# Altium PCB ECU_Carrier_PCB.PcbDoc
Units mm, origin at the board's own origin, x right, y up, seen from the top; angles counter-clockwise.
Board outline 100 x 80 mm, 2 copper layers (Top Layer, Bottom Layer); 73 components, 55 nets, 222 pads, 37 vias.
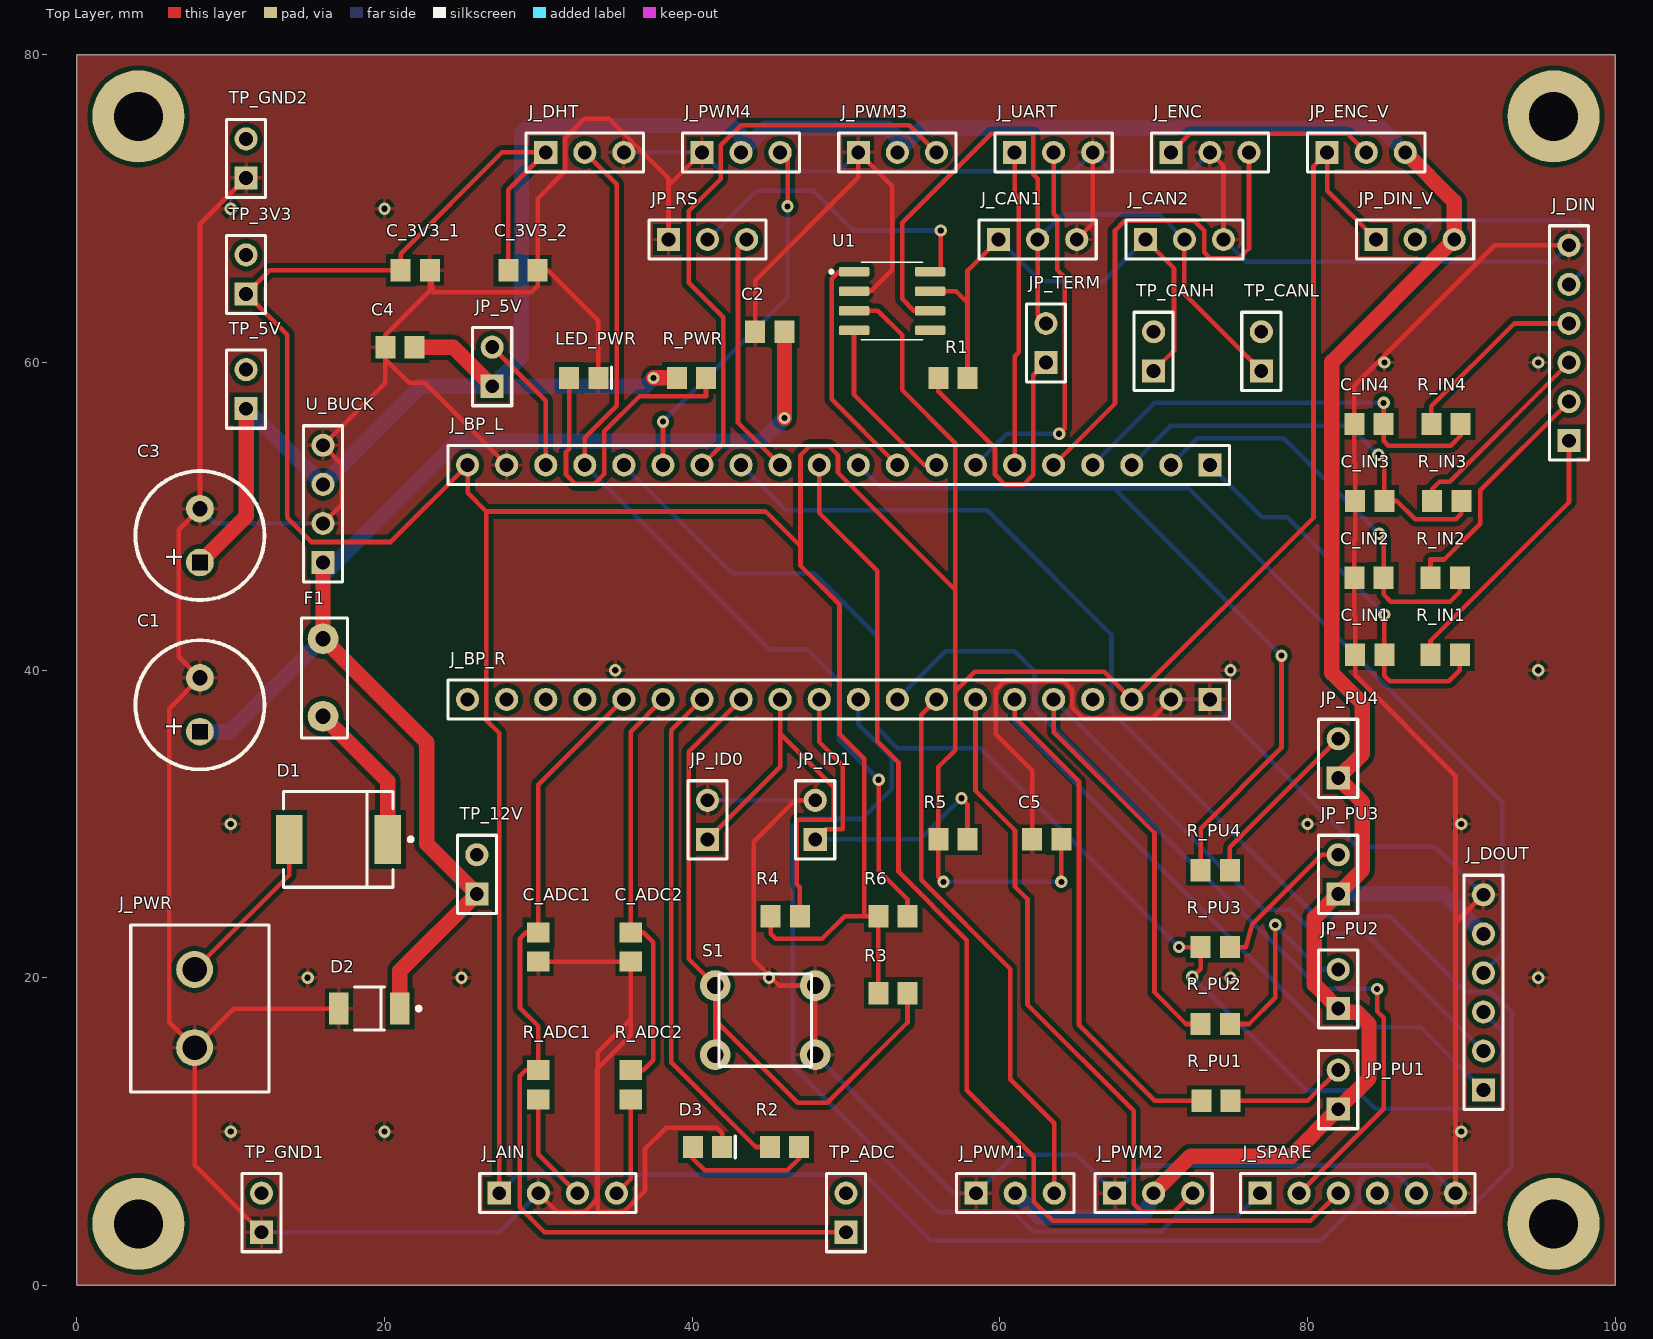
[diagram p0: Top Layer view]
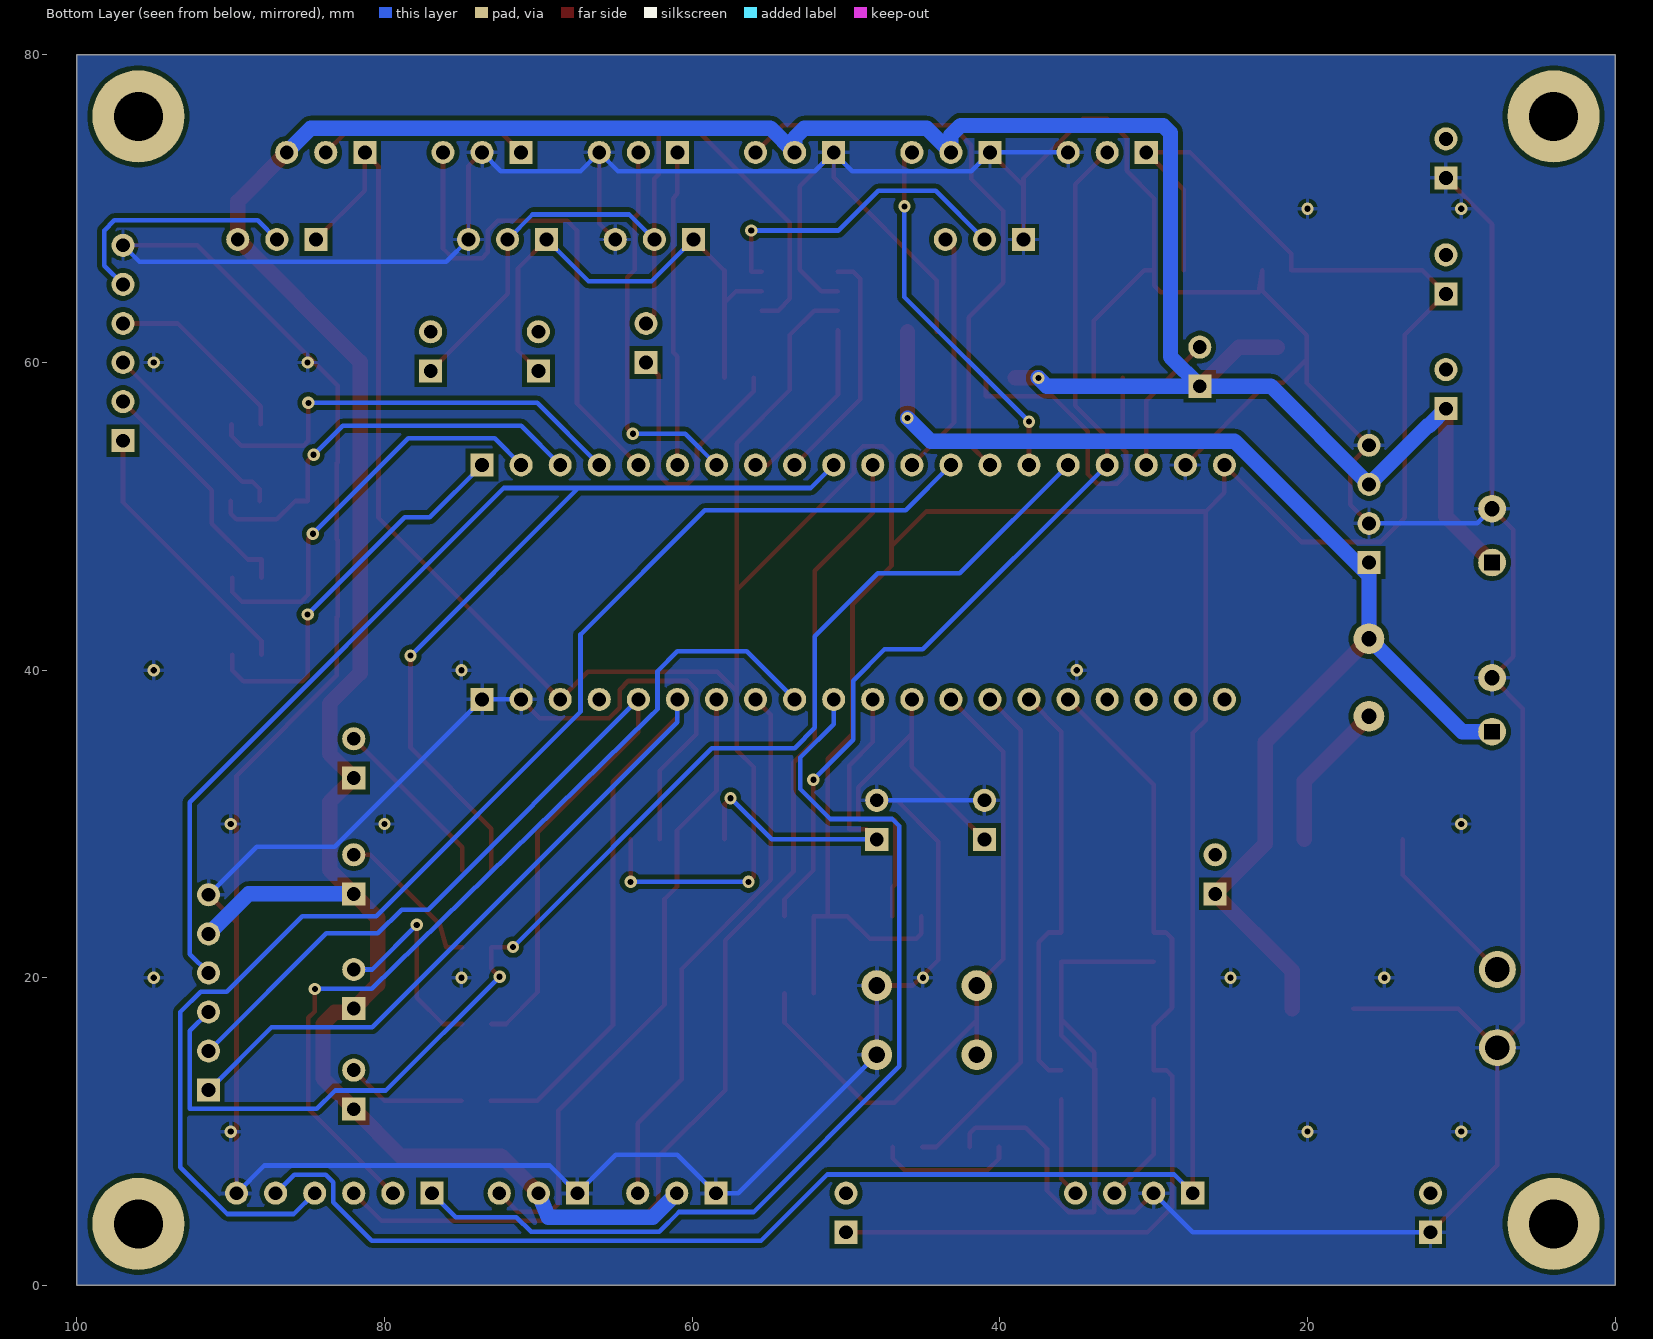
[diagram p1: Bottom Layer view, seen from below]

## Layer stack, top to bottom
Top Solder: solder mask 0.0102, Solder Resist, Dk 3.5
Top Layer: signal copper 0.0356
Dielectric 1: dielectric 0.32, FR-4, Dk 4.8
Bottom Layer: signal copper 0.0356
Bottom Solder: solder mask 0.0102, Solder Resist, Dk 3.5

## Board outline
0,0 0,80 100,80 100,0

## Design rules (kind name [scope] priority, off if disabled: settings)
Clearance [All] p1: gap=0.3 ignorepadtopadclearanceinfootprint=FALSE
HoleSize [All] p1: absolutevalues=TRUE maxlimit=3.5 minlimit=0.025 maxpercent=80.000 minpercent=20.000
MinimumAnnularRing [All] p1: minimumring=0.15
MinimumSolderMaskSliver [All] p1: minsoldermaskwidth=0.05
PolygonConnect [All] p1: connectstyle=Relief reliefconductorwidth=0.254 reliefentries=4 polygonreliefangle="90 Angle" airgapwidth=0.254
RoutingVias [All] p1: holewidth=0.4 width=0.8 viastyle="Through Hole" minholewidth=0.4 minwidth=0.8 maxholewidth=0.5 maxwidth=1
SilkToSolderMaskClearance [IsPad] p1: minsilkscreentomaskgap=0 clearancetoexposedcopper=TRUE
SolderMaskExpansion [All] p1: expansion=0.102 istentingtop=FALSE useseparateexpansions=TRUE expansionbottom=0.102 istentingbottom=FALSE
Width Width_Power [InNet('NET_J_PWR') Or InNet('12V_IN') Or InNet('12V_PROT') Or InNet('5V')] p1: maxlimit=1.5 minlimit=0.4 preferedwidth=1 minimp=50.000000 maximp=50.000000 favimp=50.000000
Width Width_Default [All] p2: maxlimit=1.5 minlimit=0.254 preferedwidth=0.3 minimp=50.000000 maximp=50.000000 favimp=50.000000
27 further rules are at their usual default settings.

## Components (designator, comment, footprint, x,y, rotation, side; value= is the part's Value field where it differs from the comment)
C1 "100uF" CP_D8_P3.5 8,36 r90 top
C2 "100nF" C_0805 45.05,62 r0 top
C3 "470uF" CP_D8_P3.5 8,47 r90 top
C4 "100nF" C_0805 21,61 r0 top
C5 "100nF" C_0805 63.05,29 r0 top
C_3V3_1 "10uF" C_0805 22,66 r0 top
C_3V3_2 "100nF" C_0805 29,66 r0 top
C_ADC1 "100nF" C_0805 30,22 r90 top
C_ADC2 "100nF" C_0805 36,22 r90 top
C_IN1 "100nF" C_0805 84.05,41 r0 top
C_IN2 "100nF" C_0805 84,46 r0 top
C_IN3 "100nF" C_0805 84.05,51 r0 top
C_IN4 "100nF" C_0805 84,56 r0 top
D1 "SS34-E3/57T" FP-95402-MFG 17,29 r180 top
D2 "SMAJ15A" FP-SMA-MFG 19.015,18 r180 top
D3 "LED1" LED_0805 41,9 r0 top
F1 "2A Polyfuse" FUSE_P5.08 16,37 r90 top
J_AIN "ANALOG IN" HDR1X4 27.46,6 r0 top
J_BP_L "J_BP_L" HDR1X20 73.66,53.34 r180 top
J_BP_R "J_BP_R" HDR1X20 73.66,38.1 r180 top
J_CAN1 "Header 3" HDR1X3 59.92,68 r0 top
J_CAN2 "Header 3" HDR1X3 69.46,68 r0 top
J_DHT "DHT22" HDR1X3 30.48,73.66 r0 top
J_DIN "DIGITAL INPUTS" HDR1X6 97,54.92 r90 top
J_DOUT "DIGITAL OUTPUTS" HDR1X6 91.44,12.7 r90 top
J_ENC "ENCODER" HDR1X3 71.12,73.66 r0 top
J_PWM1 "Header 3" HDR1X3 58.46,6 r0 top
J_PWM2 "Header 3" HDR1X3 67.46,6 r0 top
J_PWM3 "Header 3" HDR1X3 50.8,73.66 r0 top
J_PWM4 "Header 3" HDR1X3 40.64,73.66 r0 top
J_PWR "691701500002B" 691701500002B 8,18 r270 top
J_SPARE "SPARE EXP" HDR1X6 76.92,6 r0 top
J_UART "UART LOG" HDR1X3 60.96,73.66 r0 top
JP_5V "Header 2" HDR1X2 27,58.46 r90 top
JP_DIN_V "DIN_VCC SEL" HDR1X3 84.46,68 r0 top
JP_ENC_V "ENC_VCC SEL" HDR1X3 81.28,73.66 r0 top
JP_ID0 "JP_ID0" HDR1X2 41,29 r90 top
JP_ID1 "JP_ID1" HDR1X2 48,29 r90 top
JP_PU1 "PULL-UP EN" HDR1X2 82,11.46 r90 top
JP_PU2 "PULL-UP EN" HDR1X2 82,18 r90 top
JP_PU3 "PULL-UP EN" HDR1X2 82,25.46 r90 top
JP_PU4 "PULL-UP EN" HDR1X2 82,33 r90 top
JP_RS "JP_RS" HDR1X3 38.46,68 r0 top
JP_TERM "JP_TERM" HDR1X2 63,60 r90 top
LED_PWR "LED GREEN" LED_0805 32.95,59 r0 top
R1 "120R" R_0805 56.95,59 r0 top
R2 "330" R_0805 46,9 r0 top
R3 "10KR" R_0805 53.05,19 r0 top
R4 "10KR" R_0805 46.05,24 r0 top
R5 "10KR" R_0805 56.95,29 r0 top
R6 "10KR" R_0805 53.05,24 r0 top
R_ADC1 "1k" R_0805 30,13.05 r90 top
R_ADC2 "1K" R_0805 36,13.05 r90 top
R_IN1 "1K" R_0805 88.95,41 r0 top
R_IN2 "1K" R_0805 88.95,46 r0 top
R_IN3 "1K" R_0805 89.05,51 r0 top
R_IN4 "1K" R_0805 89,56 r0 top
R_PU1 "4K7" R_0805 74.05,12 r0 top
R_PU2 "4K7" R_0805 74,17 r0 top
R_PU3 "4K7" R_0805 74,22 r0 top
R_PU4 "4K7" R_0805 74,27 r0 top
R_PWR "1K" R_0805 39.95,59 r0 top
S1 "SW-PB" SW_TACT_6x6 44.75,17.25 r0 top
TP_3V3 "Header 2" HDR1X2 11,64.46 r90 top
TP_5V "Header 2" HDR1X2 11,57 r90 top
TP_12V "Header 2" HDR1X2 26,25.46 r90 top
TP_ADC "Header 2" HDR1X2 50,3.46 r90 top
TP_CANH "Header 2" HDR1X2 70,59.46 r90 top
TP_CANL "Header 2" HDR1X2 77,59.46 r90 top
TP_GND1 "Header 2" HDR1X2 12,3.46 r90 top
TP_GND2 "Header 2" HDR1X2 11,72 r90 top
U1 "SN65HVD230" SOIC127P599X175-8N 53,64 r0 top
U_BUCK "U_BUCK" HDR1X4 16,47 r90 top

## Footprints (in the part's own frame and the unit in brackets; to place one, negate y for a bottom-side part, rotate by r counter-clockwise, add the part's x,y. Pads: shape width x height; smd on the part's side, far side on the other; paste and mask are expansions set on the pad)
691701500002B [mm] "THR - 5,08mm - PCB Vertical Open - 02p"
  round 2.4 hole 1.6: 1(-2.54,-0.35) 2(2.54,-0.35)
  silkscreen extent -5.43,-4.5 5.43,4.5, body extent -5.08,-4.25 5.08,4.25, height 12.05
C_0805 [mm] "Chip Capacitor, 2-Leads, Body 2.00x1.25mm, IPC Low Density"
  rect 1.3x1.45 smd: 1(-0.95,0) 2(0.95,0)
  body extent -1.05,-0.67 1.05,0.67, height 0.6
CP_D8_P3.5 [mm]
  round 1.8 hole 1 square: 1(0,0)
  round 1.8 hole 1: 2(3.5,0)
  silkscreen extent -2.44,-4.2 5.94,4.2
FP-95402-MFG [mm]
  rect 1.72x3.2 smd paste+0 mask+0: 1(-3.205,0) 2(3.205,0)
  silkscreen extent -4.83,-3.11 3.56,3.11, body extent -4.17,-3.21 4.17,3.21, height 0.25
FP-SMA-MFG [mm]
  rect 1.27x2.1 smd paste+0 mask+0: 1(-1.985,0) 2(1.985,0)
  silkscreen extent -3.32,-1.39 0.98,1.4, body extent -2.72,-1.5 2.72,1.5, height 0.25
FUSE_P5.08 [mm]
  round 2 hole 1: 1(0,0) 2(5.05,0)
  silkscreen extent -1.4,-1.6 6.4,1.4
HDR1X2 [mm] "Connector; Header; 2 Position"
  rect 1.5x1.5 hole 0.9: 1(0,0)
  round 1.5 hole 0.9: 2(2.54,0)
  silkscreen extent -1.27,-1.27 3.81,1.27
HDR1X3 [mm] "Connector; Header; 3 Position"
  rect 1.5x1.5 hole 0.9: 1(0,0)
  round 1.5 hole 0.9: 2(2.54,0) 3(5.08,0)
  silkscreen extent -1.27,-1.27 6.35,1.27
HDR1X4 [mm] "Connector; Header; 4 Position"
  rect 1.5x1.5 hole 0.9: 1(0,0)
  round 1.5 hole 0.9: 2(2.54,0) 3(5.08,0) 4(7.62,0)
  silkscreen extent -1.27,-1.27 8.89,1.27
HDR1X6 [mm] "Connector; Header; 6 Position"
  rect 1.5x1.5 hole 0.9: 1(0,0)
  round 1.5 hole 0.9: 2(2.54,0) 3(5.08,0) 4(7.62,0) 5(10.16,0) 6(12.7,0)
  silkscreen extent -1.27,-1.27 13.97,1.27
HDR1X20 [mm] "Connector; Header; 20 Position"
  rect 1.5x1.5 hole 0.9: 1(0,0)
  round 1.5 hole 0.9: 2(2.54,0) 3(5.08,0) 4(7.62,0) 5(10.16,0) 6(12.7,0) 7(15.24,0) 8(17.78,0) 9(20.32,0) 10(22.86,0) 11(25.4,0) 12(27.94,0) 13(30.48,0) 14(33.02,0) 15(35.56,0) 16(38.1,0) 17(40.64,0) 18(43.18,0) 19(45.72,0) 20(48.26,0)
  silkscreen extent -1.27,-1.27 49.53,1.27
LED_0805 [mm] "Chip Led, 2-Leads, Body 2.00x1.25mm, IPC Low Density"
  rect 1.3x1.45 smd: 1(-0.95,0) 2(0.95,0)
  silkscreen extent 1.8,-0.7 1.8,0.7, body extent -1.05,-0.67 1.05,0.67, height 0.6
R_0805 [mm] "Chip Resistor, 2-Leads, Body 2.00x1.25mm, IPC Low Density"
  rect 1.3x1.45 smd: 1(-0.95,0) 2(0.95,0)
  body extent -1.05,-0.67 1.05,0.67, height 0.6
SOIC127P599X175-8N [mm]
  rrect25% 1.97x0.6 smd: 1(-2.47,1.905) 2(-2.47,0.635) 3(-2.47,-0.635) 4(-2.47,-1.905) 5(2.47,-1.905) 6(2.47,-0.635) 7(2.47,0.635) 8(2.47,1.905)
  silkscreen extent -4.05,-2.52 1.99,2.52, body extent -3,-2.45 3,2.45, height 1.75
SW_TACT_6x6 [mm]
  round 2 hole 1.1: 1(-3.25,-2.25) 1(-3.25,2.25) 2(3.25,-2.25) 2(3.25,2.25)
  silkscreen extent -3,-3 3,3

## Part data
C1 C3: library part "Cap Pol1", "Polarized Capacitor (Radial)", LatestRevisionDate=17-Jul-2002, LatestRevisionNote="Re-released for DXP Platform.", PackageDescription="Polarized Capacitor (Radial); 2 Leads", PackageReference=RB7.6-15, Published=8-Jun-2000, Publisher="Altium Limited"
C2 C4 C5 C_3V3_1 C_3V3_2 C_ADC1 C_ADC2 C_IN1 C_IN2 C_IN3: library part Cap, "Capacitor", LatestRevisionDate=17-Jul-2002, LatestRevisionNote="Re-released for DXP Platform.", PackageDescription="Radial Cap, Thru-Hole; 2 Leads; 0.3 in Pin Spacing", PackageReference=RAD-0.3, Published=8-Jun-2000, Publisher="Altium Limited"
C_IN4: library part Cap, LatestRevisionDate=17-Jul-2002, LatestRevisionNote="Re-released for DXP Platform.", PackageDescription="Radial Cap, Thru-Hole; 2 Leads; 0.3 in Pin Spacing", PackageReference=RAD-0.3, Published=8-Jun-2000, Publisher="Altium Limited"
D1: library part CMP-02539-000012-1, "DIODE SCHOTTKY 40V 3A DO214AB", Forward Current=3A, Manufacturer=Vishay, Max Junction Temp=+150°C, Max Repetitive Reverse Voltage=40V, Max Surge Forward Current=100A, Package=95402, Peak Reverse Current=0.5mA, Temperature="-55°C to +150°C", Temperature Range Low=-55°C, Automotive=No, Category=Diode, ComponentLink2Description=Datasheet, ComponentLink2URL=http://www.vishay.com/docs/88751/ss32.pdf, Device Class L1="Discrete Semiconductors", Device Class L2=Diodes, Device Class L3="Schottky Diodes", Digikey Description="DIODE SCHOTTKY 40V 3A DO214AB", Footprint Url=http://www.vishay.com/docs/95402/smc.pdf, Height=2.62mm, Lead Free=Yes, Manufacturer Part Number=SS34-E3/57T, Mouser Description="Schottky Diodes & Rectifiers 3.0 Amp 40 Volt", Octopart=https://octopart.com/ss34-e3%2F57t-vishay-39552907, RoHS=TRUE, Standoff Height=0mm, Temperature Range High=+150°C
D2: library part CMP-07401-000026-1, "TVS DIODE 15V 24.4V SMA", Breakdown Voltage=16.7V, Clamping Voltage=24.4V, Manufacturer="Bourns Inc.", Max Junction Temp=+150°C, Package=SMA, Peak Pulse Current=16.4A, Peak Pulse Power=400W, Reverse Standoff Voltage=15V, Temperature="-55°C to +150°C", Temperature Range Low=-55°C, Automotive=No, Category=Diode, ComponentLink2Description=Datasheet, ComponentLink2URL=https://www.bourns.com/docs/Product-Datasheets/SMAJ.pdf, Device Class L1="Circuit Protection", Device Class L2="TVS Diodes", Device Class L3=unset, Digikey Description="TVS DIODE 15V 24.4V SMA", Direction=Unidirectional, Height=2.29mm, Lead Free=Yes, Manufacturer Part Number=SMAJ15A, Mouser Description="Bourns Smaj15a / Diode Tvs 15v 400w Uni 5% Smd Bourns", Number Of Channels=1, Octopart=https://octopart.com/smaj15a-bourns-12809353, RoHS=TRUE, Temperature Range High=+150°C
D3: "Typical RED GaAs LED", LatestRevisionDate=08-Jul-2005, LatestRevisionNote="Mech Layer 1 removed.", PackageDescription="LED; 2 Leads", PackageReference=LED-1, Published=8-Jun-2000, Publisher="Altium Limited"
F1: library part "Fuse 1", "Fuse", LatestRevisionDate=17-Jul-2002, LatestRevisionNote="Re-released for DXP Platform.", PackageDescription="Thru-Hole; 2 Leads", PackageReference=PIN-W2/E2.8, Published=8-Jun-2000, Publisher="Altium Limited"
J_AIN U_BUCK: library part "Header 4", "Header, 4-Pin", LatestRevisionDate=17-Jul-2002, LatestRevisionNote="Re-released for DXP Platform.", Publisher="Altium Limited"
J_BP_L J_BP_R: library part "Header 20", "Header, 20-Pin", LatestRevisionDate=17-Jul-2002, LatestRevisionNote="Re-released for DXP Platform.", Publisher="Altium Limited"
J_CAN1 J_CAN2 J_PWM1 J_PWM2 J_PWM3 J_PWM4: "Header, 3-Pin", LatestRevisionDate=17-Jul-2002, LatestRevisionNote="Re-released for DXP Platform.", Publisher="Altium Limited"
J_DHT J_ENC J_UART JP_DIN_V JP_ENC_V JP_RS: library part "Header 3", "Header, 3-Pin", LatestRevisionDate=17-Jul-2002, LatestRevisionNote="Re-released for DXP Platform.", Publisher="Altium Limited"
J_DIN J_DOUT J_SPARE: library part "Header 6", "Header, 6-Pin", LatestRevisionDate=17-Jul-2002, LatestRevisionNote="Re-released for DXP Platform.", Publisher="Altium Limited"
J_PWR: library part CMP-1502-02318-3, "Terminal Block, 5.08MM, Open Vertical Pcb Header, Thr Type, 2 Pins", Color=Black, Current Rating=10A, Max Operating Temperature=105°C, Min Operating Temperature=-40°C, Voltage Rating=300V, Connector Type="Terminal Block", Contact Gender=Male, Contact Material=Brass, Contact Plating=Tin, Gender=Male, Housing Material=Polymer, Lead Pitch=5.08mm, Length=9.76mm, Mount="Through Hole", Number of Contacts=2, Number of Pins=2, Pitch=5.08mm, REACH SVHC=Unknown, RoHS=Compliant, Termination=PCB
JP_5V TP_3V3 TP_5V TP_12V TP_ADC TP_CANH TP_CANL TP_GND1 TP_GND2: "Header, 2-Pin", LatestRevisionDate=17-Jul-2002, LatestRevisionNote="Re-released for DXP Platform.", Publisher="Altium Limited"
JP_ID0 JP_ID1 JP_PU1 JP_PU2 JP_PU3 JP_PU4 JP_TERM: library part "Header 2", "Header, 2-Pin", LatestRevisionDate=17-Jul-2002, LatestRevisionNote="Re-released for DXP Platform.", Publisher="Altium Limited"
LED_PWR: library part LED2, "Typical RED, GREEN, YELLOW, AMBER GaAs LED", LatestRevisionDate=17-Jul-2002, LatestRevisionNote="Re-released for DXP Platform.", PackageDescription="SM LED; 2 Flat Leads", PackageReference=3.2X1.6X1.1, PackageVersion=Feb-2002, Published=8-Jun-2000, Publisher="Altium Limited"
R1 R2 R3 R4 R5 R6 R_ADC1 R_ADC2 R_IN1 R_IN2 R_IN3 R_IN4 R_PU1 R_PU2 R_PU3 R_PU4 R_PWR: library part Res1, "Resistor", LatestRevisionDate=17-Jul-2002, LatestRevisionNote="Re-released for DXP Platform.", PackageDescription="Axial Device, Thru-Hole; 2 Leads; 0.3 in Pin Spacing", PackageReference=AXIAL-0.3, Published=8-Jun-2000, Publisher="Altium Limited"
S1: "Switch", LatestRevisionDate=17-Jul-2002, LatestRevisionNote="Re-released for DXP Platform.", PackageDescription="Switch; 2 Leads", PackageReference=SPST-2, Published=24-Mar-1999, Publisher="Altium Limited"
U1: "1/1 Transceiver Half CANbus 8-SOIC", Package="SOIC-8 Texas Instruments", Check_prices=https://www.snapeda.com/parts/SN65HVD230/Texas+Instruments/view-part/?ref=eda, MF="Texas Instruments", MP=SN65HVD230, SnapEDA_Link=https://www.snapeda.com/parts/SN65HVD230/Texas+Instruments/view-part/?ref=snap

## Free pads (board coordinates)
  round 6 hole 3.2 unplated: MH1(4,4) MH2(96,4) MH3(96,76) MH4(4,76)

## Via types
v1: diameter 0.8, hole 0.4, Top Layer to Bottom Layer, tented both sides, 37 vias

## Nets (pads, with @x,y where several pads share a name; then routed paths per layer and width w, separated by ;. In a path a pad name is that pad's centre, name@x,y a point inside that pad or via, vN(x,y) a via of type N, cw(c..) or ccw(c..) an arc to the next point about the centre after c; other vN are vias at no path point)
3V3: C5.2 C_3V3_1.1 C_3V3_2.1 J_AIN.1 J_BP_L.20 J_BP_R.3 J_DHT.1 J_SPARE.5 JP_DIN_V.1 JP_ENC_V.1 R3.1 R4.1 R5.1 R6.1 TP_3V3.1 U1.3 | length 369.9
  Top Layer w0.3: J_AIN.1 27.46,35.913 26.619,36.754 26.619,50.317 ; C_3V3_2.1 28.05,71.23 J_DHT.1 27.635,73.66 21.05,67.075 C_3V3_1.1 12.54,66 TP_3V3.1 13.665,61.795 13.665,49.911 15.24,48.336 20.396,48.336 J_BP_L.20 25.4,51.537 26.619,50.317 ; R4.1 45.1,22.86 45.43,22.53 48.441,22.53 49.911,24 51.184,24 ; U1.3 52.07,63.365 53.645,61.79 53.645,58.217 57.099,54.762 57.099,45.212 ; R3.1 R6.1 51.184,24 ; v1(56.337,26.238) 56,26.575 R5.1 56,33.706 57.099,34.805 57.099,38.633 ; v1(64,26.238) C5.2 ; JP_DIN_V.1 81.28,71.18 JP_ENC_V.1 80.391,72.771 80.391,49.911 J_BP_R.3 66.78,39.9 58.366,39.9 57.099,38.633 ; 26.619,50.317 44.78,50.317 47.041,48.057 ; 47.041,48.057 47.041,53.975 47.625,54.559 48.895,54.559 49.479,53.975 49.479,52.832 57.099,45.212 ; 47.041,48.057 47.041,46.787 49.581,44.247 49.581,35.839 51.184,34.236 51.184,24 ; 57.099,38.633 57.099,45.212
  Bottom Layer w0.3: J_AIN.1 28.674,7.214 51.206,7.214 55.525,2.895 80.822,2.895 83.337,5.41 83.337,6.717 83.82,7.2 85.88,7.2 J_SPARE.5 ; v1(56.337,26.238) v1(64,26.238)
5V: C3.1 C4.2 J_DOUT.5 J_PWM1.2 J_PWM2.2 J_PWM3.2 J_PWM4.2 JP_5V.1 JP_DIN_V.3 JP_ENC_V.3 JP_PU1.1 JP_PU2.1 JP_PU3.1 JP_PU4.1 R_PWR.1 TP_5V.1 U_BUCK.3 | length 238.3
  Top Layer w1: C3.1 11,50 TP_5V.1 ; C4.2 24.46,61 JP_5V.1 ; v1(37.49,59) R_PWR.1 ; J_PWM2.2 72.407,8.407 78.947,8.407 JP_PU1.1 84,13.46 84,17 83.25,17.75 82.25,17.75 80.442,19.558 80.442,23.902 JP_PU3.1 83.566,27.026 83.566,31.434 JP_PU4.1 83.566,34.566 83.566,37.821 81.585,39.802 81.585,60.045 JP_DIN_V.3 89.54,70.48 JP_ENC_V.3
  Bottom Layer w1: TP_5V.1 12.116,55.884 12.196,55.884 U_BUCK.3 22.38,58.46 JP_5V.1 ; v1(37.49,59) 36.95,58.46 JP_5V.1 ; J_PWM1.2 62.555,4.445 69.365,4.445 J_PWM2.2 ; JP_PU3.1 88.84,25.46 J_DOUT.5 ; JP_ENC_V.3 84.785,75.235 54.915,75.235 J_PWM3.2 53.34,74.6 52.705,75.235 44.755,75.235 J_PWM4.2 43.18,74.778 42.545,75.413 29.388,75.413 28.905,74.93 28.905,60.365 JP_5V.1
5V_BP: J_BP_L.18 JP_5V.2 | length 9.1
  Top Layer w0.3: JP_5V.2 30.48,57.52 J_BP_L.18
12V_IN: D1.1 F1.1 | length 9.7
  Top Layer w1: F1.1 20.205,32.795 D1.1
12V_PROT: C1.1 C2.2 D2.1 F1.2 TP_12V.1 U_BUCK.1 | length 89.7
  Top Layer w1: U_BUCK.1 F1.2 22.733,35.317 22.733,28.727 TP_12V.1 21,20.46 D2.1 ; v1(46,56.389) C2.2
  Bottom Layer w1: C1.1 9.95,36 F1.2 16,46.15 24.74,54.89 44.501,54.89 v1(46,56.389)
ADC_A: C_ADC1.2 J_BP_R.16 R_ADC1.2 TP_ADC.1 | length 59.7
  Top Layer w0.3: J_BP_R.16 30,32.54 C_ADC1.2 29.21,22.95 28.804,22.544 28.804,18.062 30,16.866 R_ADC1.2 29.164,14 28.778,13.614 28.778,5.08 30.398,3.46 TP_ADC.1
ADC_B: C_ADC2.2 J_BP_R.15 R_ADC2.2 | length 27.2
  Top Layer w0.3: R_ADC2.2 36.83,14 37.465,14.635 37.465,22.315 36.83,22.95 C_ADC2.2 36,36 J_BP_R.15
CAN_H: J_CAN1.1 J_CAN2.1 R1.2 TP_CANH.1 U1.7 | length 34.2
  Top Layer w0.3: U1.7 57.15,64.635 57.9,63.885 ; R1.2 57.9,63.885 ; J_CAN1.1 57.9,65.98 57.9,63.885 ; J_CAN2.1 71.323,66.137 71.323,60.783 TP_CANH.1
  Bottom Layer w0.3: J_CAN1.1 62.642,65.278 66.738,65.278 J_CAN2.1
CAN_L: J_CAN1.2 J_CAN2.2 JP_TERM.2 TP_CANL.1 U1.6 | length 52.2
  Top Layer w0.3: U1.6 54.415,63.365 53.645,64.135 53.645,69.088 59.436,74.879 62.179,74.879 62.179,72.238 62.46,71.957 J_CAN1.2 62.46,63.08 JP_TERM.2 ; J_CAN2.2 72,64.46 TP_CANL.1
  Bottom Layer w0.3: J_CAN1.2 64.081,69.621 70.379,69.621 J_CAN2.2
CAN_RX: J_BP_L.8 U1.4 | length 11.4
  Top Layer w0.3: U1.4 50.521,62.095 50.521,57.912 55.093,53.34 J_BP_L.8
CAN_STBY: J_BP_L.12 JP_RS.3 | length 16
  Top Layer w0.3: JP_RS.3 42.977,67.437 42.977,56.083 J_BP_L.12
CAN_TX: J_BP_L.9 U1.1 | length 15.5
  Top Layer w0.3: U1.1 49.53,65.905 49.073,65.448 49.073,57.607 J_BP_L.9
DHT_DATA: J_BP_L.17 J_DHT.2 R6.2 | length 61.5
  Top Layer w0.3: J_BP_L.17 33.02,55.118 35.103,57.201 35.103,71.577 J_DHT.2 ; v1(52.121,32.874) 52.121,26.975 54,25.096 R6.2
  Bottom Layer w0.3: J_BP_L.17 45.009,41.351 47.498,41.351 49.53,39.319 49.53,35.465 v1(52.121,32.874)
DI_1: C_IN1.2 J_BP_L.1 R_IN1.2 | length 25.7
  Top Layer w0.3: v1(85,43.626) C_IN1.2 85,39.638 85.36,39.278 89.173,39.278 89.9,40.005 R_IN1.2
  Bottom Layer w0.3: J_BP_L.1 77.064,49.936 78.689,49.936 v1(85,43.626)
DI_2: C_IN2.2 J_BP_L.2 R_IN2.2 | length 27.2
  Top Layer w0.3: v1(84.658,48.87) 84.95,48.578 C_IN2.2 84.95,44.92 85.42,44.45 89.265,44.45 89.9,45.085 R_IN2.2
  Bottom Layer w0.3: J_BP_L.2 72.847,55.067 78.461,55.067 v1(84.658,48.87)
DI_3: C_IN3.2 J_BP_L.3 R_IN3.2 | length 27.5
  Top Layer w0.3: v1(84.607,54) 85,53.608 C_IN3.2 85.804,51 86.995,49.809 89.644,49.809 90,50.165 R_IN3.2
  Bottom Layer w0.3: J_BP_L.3 71.12,55.88 82.728,55.88 v1(84.607,54)
DI_4: C_IN4.2 J_BP_L.4 R_IN4.2 | length 29.2
  Top Layer w0.3: v1(84.95,57.379) C_IN4.2 84.95,54.902 85.252,54.6 89.305,54.6 89.95,55.245 R_IN4.2
  Bottom Layer w0.3: J_BP_L.4 70.079,57.379 v1(84.95,57.379)
DIN_VCC: J_DIN.5 JP_DIN_V.2 | length 16
  Bottom Layer w0.3: JP_DIN_V.2 88.24,69.24 97.561,69.24 98.222,68.58 98.222,66.302 J_DIN.5
DO_1: J_BP_R.6 J_DOUT.1 R_PU1.1 | length 74.8
  Top Layer w0.3: J_BP_R.6 60.96,36.932 65.151,32.741 65.151,16.928 70.079,12 R_PU1.1
  Bottom Layer w0.3: J_BP_R.6 60.96,36.627 80.797,16.789 87.351,16.789 J_DOUT.1
DO_2: J_BP_R.5 J_DOUT.2 R_PU2.1 | length 63
  Top Layer w0.3: J_BP_R.5 63.5,35.966 70.053,29.413 70.053,19.05 72.103,17 R_PU2.1
  Bottom Layer w0.3: J_BP_R.5 77.167,24.433 78.891,24.433 80.439,22.885 83.795,22.885 J_DOUT.2
DO_3: J_BP_L.16 J_DOUT.3 R_PU3.1 | length 86.6
  Top Layer w0.3: v1(71.649,22) R_PU3.1 73.05,20.599 v1(72.517,20.066)
  Bottom Layer w0.3: J_BP_L.16 42.596,46.304 47.93,46.304 52.019,42.215 52.019,36.246 53.34,34.925 58.724,34.925 v1(71.649,22) ; v1(72.517,20.066) 79.908,12.675 83.21,12.675 84.404,11.481 92.659,11.481 92.659,16.561 J_DOUT.3
DO_4: J_BP_L.10 J_DOUT.4 R_PU4.1 | length 94.1
  Top Layer w0.3: R_PU4.1 73.05,29.692 78.308,34.95 v1(78.308,40.945)
  Bottom Layer w0.3: J_BP_L.10 52.299,51.841 67.412,51.841 ; v1(78.308,40.945) 67.412,51.841 ; J_DOUT.4 92.659,21.539 92.659,31.42 72.238,51.841 67.412,51.841
ECU_ID0: J_BP_R.12 JP_ID0.1 R4.2 | length 26.8
  Top Layer w0.3: JP_ID0.1 45.72,33.72 45.72,35.865 ; J_BP_R.12 45.72,35.865 ; R4.2 47,25.886 46.8,26.086 46.8,30.201 46.876,30.277 49.149,30.277 49.2,30.328 49.2,32.385 45.72,35.865
ECU_ID1: J_BP_R.11 JP_ID1.1 R5.2 | length 24.6
  Top Layer w0.3: JP_ID1.1 48.67,29.67 49.8,29.67 49.8,33.791 48.26,35.331 J_BP_R.11 ; v1(57.506,31.674) 57.9,31.279 R5.2
  Bottom Layer w0.3: JP_ID1.1 54.832,29 v1(57.506,31.674)
ENC_CAP: J_BP_L.5 J_ENC.3 | length 34.2
  Top Layer w0.3: J_BP_L.5 67.488,57.328 67.488,68.58 68.123,69.215 72.644,69.215 73.279,68.58 73.279,67.158 73.66,66.777 75.565,66.777 76.2,67.412 J_ENC.3
ENC_VCC: J_ENC.1 JP_ENC_V.2 | length 13.7
  Top Layer w0.3: J_ENC.1 72.339,74.879 82.601,74.879 JP_ENC_V.2
EXT_ADC_A: J_AIN.3 R_ADC1.1 | length 7.2
  Top Layer w0.3: R_ADC1.1 30,8.54 J_AIN.3
EXT_ADC_B: J_AIN.4 R_ADC2.1 | length 6.5
  Top Layer w0.3: J_AIN.4 36,6.92 R_ADC2.1
EXT_DI_1: J_DIN.1 R_IN1.1 | length 17.6
  Top Layer w0.3: R_IN1.1 88,41.91 97,50.91 J_DIN.1
EXT_DI_2: J_DIN.2 R_IN2.1 | length 15.7
  Top Layer w0.3: R_IN2.1 88,47.193 88.9,47.193 91.237,49.53 91.237,51.697 J_DIN.2
EXT_DI_3: J_DIN.3 R_IN3.1 | length 13.1
  Top Layer w0.3: R_IN3.1 88.1,51.778 88.582,52.261 89.261,52.261 J_DIN.3
EXT_DI_4: J_DIN.4 R_IN4.1 | length 12.3
  Top Layer w0.3: R_IN4.1 88.05,57.15 93.44,62.54 J_DIN.4
GND: C1.2 C2.1 C3.2 C4.1 C5.1 C_3V3_1.2 C_3V3_2.2 C_ADC1.1 C_ADC2.1 C_IN1.1 C_IN2.1 C_IN3.1 C_IN4.1 D2.2 D3.2 J_AIN.2 J_BP_L.19 J_BP_R.1 J_BP_R.2 J_CAN1.3 J_CAN2.3 J_DHT.3 J_DIN.6 J_DOUT.6 J_ENC.2 J_PWM1.1 J_PWM2.1 J_PWM3.1 J_PWM4.1 J_PWR.2 J_SPARE.6 J_UART.3 JP_ID0.2 JP_ID1.2 JP_RS.1 LED_PWR.2 S1.2 TP_GND1.1 TP_GND2.1 U1.2 U_BUCK.2 U_BUCK.4 | length 546.9
  Top Layer w0.3: TP_GND2.1 8,69 C3.2 6.629,49.129 6.629,40.871 C1.2 5.994,37.494 5.994,17.116 J_PWR.2 ; TP_GND1.1 7.65,7.81 J_PWR.2 ; U_BUCK.2 17.221,50.761 17.221,53.399 U_BUCK.4 20.05,58.67 20.05,60.214 ; D2.2 10.19,18 J_PWR.2 ; J_BP_L.19 22.606,58.674 21.59,58.674 20.05,60.214 ; J_AIN.2 31.225,4.775 33.02,4.775 33.807,5.563 33.807,14.072 33.858,14.122 ; C_ADC1.1 C_ADC2.1 36,17.306 ; LED_PWR.2 33.9,62.707 30.607,66 C_3V3_2.2 ; JP_RS.1 38.46,71.48 ; J_PWM4.1 38.46,71.48 ; D3.2 41.95,9.904 41.593,10.262 38.303,10.262 36.932,8.89 36.932,6.147 35.56,4.775 33.884,4.775 33.858,4.801 33.858,14.122 ; C2.1 44.1,65.334 50.8,72.034 J_PWM3.1 53.01,71.45 53.01,66.04 51.605,64.635 U1.2 ; S1.2@48,15 48,19.5 45.651,19.5 43.993,21.158 43.993,28.846 46.687,31.54 JP_ID1.2 ; C5.1 62.1,33.48 59.741,35.839 59.741,38.735 60.306,39.3 64.154,39.3 64.719,38.735 64.719,37.567 65.405,36.881 69.901,36.881 J_BP_R.2 ; J_CAN1.3 66.04,69.04 J_UART.3 ; J_ENC.2 74.54,72.78 J_CAN2.3 ; J_SPARE.6 89.62,23.58 ; J_DOUT.6 89.62,23.58 ; J_DIN.6 92.174,67.62 83.05,58.496 C_IN4.1 83.05,53.517 83.1,53.467 C_IN3.1 83.1,48.513 83.05,48.463 C_IN2.1 83.05,43.509 83.1,43.459 C_IN1.1 83.1,39.658 89.62,33.138 89.62,23.58 ; 20.05,60.214 C4.1 20.05,61.782 22.994,64.726 ; 22.994,64.726 22.95,64.77 C_3V3_1.2 23.15,64.57 ; 22.994,64.726 23.15,64.57 ; 23.15,64.57 29.527,64.57 29.95,64.993 C_3V3_2.2 ; C_3V3_2.2 29.95,70.666 31.75,72.466 31.75,74.574 33.02,75.844 34.595,75.844 38.46,71.979 38.46,71.48 ; 33.858,14.122 33.858,15.164 36,17.306 ; 33.858,14.122 36,16.264 36,17.306
  Bottom Layer w0.3: C3.2 8.96,49.54 U_BUCK.2 ; TP_GND1.1 27.46,3.46 J_AIN.2 ; J_DHT.3 J_PWM4.1 41.859,72.441 49.581,72.441 J_PWM3.1 52.019,72.441 64.821,72.441 J_UART.3 67.259,72.441 72.441,72.441 J_ENC.2 ; JP_ID0.2 JP_ID1.2 ; S1.2@48,15 57,6 J_PWM1.1 60.96,8.5 64.96,8.5 J_PWM2.1 69.26,7.8 87.82,7.8 J_SPARE.6 ; J_BP_R.2 J_BP_R.1 83.236,28.524 88.316,28.524 J_DOUT.6 ; J_CAN2.3 75.992,66.548 95.928,66.548 J_DIN.6
  other v1: 10,10 20,10 90,10 15,20 25,20 45,20 75,20 95,20 10,30 80,30 90,30 35,40 75,40 95,40 85,60 95,60 10,70 20,70
LED_FAULT: J_BP_R.14 R2.1 | length 33.1
  Top Layer w0.3: J_BP_R.14 38.633,36.093 38.633,14.499 44.133,9 R2.1
NetD1_2: D1.2 J_PWR.1 | length 11
  Top Layer w0.3: J_PWR.1 13.795,26.685 D1.2
NetD3_1: D3.1 R2.2 | length 9
  Top Layer w0.3: D3.1 40.05,8.255 40.812,7.493 46.188,7.493 46.95,8.255 R2.2
NetJP_PU1_2: JP_PU1.2 R_PU1.2 | length 7.8
  Top Layer w0.3: R_PU1.2 80,12 JP_PU1.2
NetJP_PU2_2: JP_PU2.2 R_PU2.2 | length 13.7
  Top Layer w0.3: R_PU2.2 76.2,17 77.902,18.702 v1(77.902,23.444)
  Bottom Layer w0.3: v1(77.902,23.444) 80.806,20.54 JP_PU2.2
NetJP_PU3_2: JP_PU3.2 R_PU3.2 | length 10.1
  Top Layer w0.3: R_PU3.2 76,22 76.417,23.495 80.922,28 JP_PU3.2
NetJP_PU4_2: JP_PU4.2 R_PU4.2 | length 11.5
  Top Layer w0.3: R_PU4.2 74.95,28.49 JP_PU4.2
NetJP_TERM_1: JP_TERM.1 R1.1 | length 18.5
  Top Layer w0.3: R1.1 56,58.122 59.69,54.432 59.69,52.705 60.325,52.07 61.544,52.07 62.179,52.705 62.179,59.179 JP_TERM.1
NetLED_PWR_1: LED_PWR.1 R_PWR.2 | length 20.9
  Top Layer w0.3: LED_PWR.1 32,54.381 31.801,54.182 31.801,52.705 32.385,52.121 33.655,52.121 34.29,52.756 34.29,55.524 36.576,57.81 40.9,57.81 R_PWR.2
NRST: J_BP_R.4
PWM_H1: J_BP_R.8 J_PWM1.3 | length 36.1
  Top Layer w0.3: J_BP_R.8 54.889,37.109 54.889,26.365 60.681,20.574 60.681,13.411 63.54,10.552 J_PWM1.3
PWM_H2: J_BP_R.7 J_PWM2.3 | length 41.6
  Top Layer w0.3: J_BP_R.7 58.42,32.156 60.985,29.591 60.985,25.933 61.798,25.121 61.798,18.263 68.707,11.354 68.707,5.309 69.216,4.8 71.34,4.8 J_PWM2.3
PWM_L1: J_BP_L.14 J_PWM3.3 | length 38.4
  Top Layer w0.3: J_BP_L.14 42.012,54.712 42.012,62.941 39.776,65.176 39.776,69.85 41.859,71.933 41.859,74.117 43.18,75.438 54.102,75.438 J_PWM3.3
PWM_L2: J_BP_L.15 J_PWM4.3 | length 23.9
  Top Layer w0.3: J_BP_L.15 v1(38.1,56.159) ; J_PWM4.3 46.203,73.177 v1(46.203,70.155)
  Bottom Layer w0.3: v1(38.1,56.159) 46.203,64.262 v1(46.203,70.155)
RS: JP_RS.2 U1.8 | length 20.9
  Top Layer w0.3: U1.8 56.159,65.905 v1(56.159,68.58)
  Bottom Layer w0.3: JP_RS.2 44.171,71.171 47.904,71.171 50.495,68.58 v1(56.159,68.58)
SPARE_A6: J_BP_R.10 J_SPARE.1 | length 65.7
  Bottom Layer w0.3: J_BP_R.10 50.8,36.496 52.971,34.325 52.971,32.274 51.025,30.328 46.99,30.328 46.533,29.87 46.533,14.249 56.007,4.775 60.858,4.775 62.139,3.495 70.475,3.495 71.425,4.445 75.365,4.445 J_SPARE.1
SPARE_A7: J_BP_R.9 J_SPARE.2 | length 58.6
  Top Layer w0.3: J_SPARE.2 84.95,11.49 84.95,17.394 84.531,17.812 v1(84.531,19.279)
  Bottom Layer w0.3: J_BP_R.9 56.464,41.224 60.96,41.224 62.255,39.929 62.255,37.465 62.814,36.906 80.823,19.279 v1(84.531,19.279)
SPARE_B3: J_BP_L.11 J_SPARE.3 | length 74.7
  Top Layer w0.3: J_BP_L.11 48.26,50.216 52.019,46.457 52.019,35.382 53.416,33.985 53.416,26.899 57.861,22.454 57.861,12.7 62.205,8.357 62.205,5.436 63.44,4.2 80.2,4.2 J_SPARE.3
SPARE_B5: J_BP_L.13 J_SPARE.4 | length 88.4
  Bottom Layer w0.3: J_BP_L.13 46.126,50.394 59.182,50.394 67.259,42.316 67.259,37.287 80.543,24.003 85.344,24.003 90.246,19.101 91.948,19.101 93.269,17.78 93.269,7.696 90.221,4.648 85.892,4.648 J_SPARE.4
UART_RX: J_BP_L.7 J_UART.2 | length 25
  Top Layer w0.3: J_UART.2 63.5,69.672 63.729,69.444 63.729,66.015 64.211,65.532 64.211,55.728 v1(63.856,55.372)
  Bottom Layer w0.3: J_BP_L.7 60.452,55.372 v1(63.856,55.372)
UART_TX: J_BP_L.6 J_UART.1 | length 20.6
  Top Layer w0.3: J_BP_L.6 60.96,60.401 61.239,60.681 61.239,70.688 60.96,70.968 J_UART.1
USER_BTN: J_BP_R.13 R3.2 S1.1 | length 44
  Top Layer w0.3: S1.1@41.5,15 41.5,17.247 ; J_BP_R.13 39.776,34.696 39.776,21.224 41.5,19.5 41.5,17.247 ; R3.2 54,17.094 48.793,11.887 46.859,11.887 41.5,17.247
pads on no net: J_BP_R.17 J_BP_R.18 J_BP_R.19 J_BP_R.20 TP_3V3.2 TP_5V.2 TP_12V.2 TP_ADC.2 TP_CANH.2 TP_CANL.2 TP_GND1.2 TP_GND2.2 U1.5

## Polygon pours and split planes (outlines as drawn)
GND on Top Layer "GND_L01_P000" (solid, remove dead copper, pour order 0): 0,80 100,80 100,0 0,0
GND on Bottom Layer "GND_L02_P002" (solid, remove dead copper, pour order 2): 0,80 100,80 100,0 0,0

## Silkscreen, mask and mechanical layers (free items; w line width, h text height)
Mechanical 1:
  the board outline again, w0.2

## Text inside footprints (layer, text, board x,y; h text height)
C1: Top Overlay "+" at 6.846,35.654 h1.2 r90
C3: Top Overlay "+" at 6.846,46.654 h1.2 r90
J_PWR: Assembly Notes "Stencil thickness : 120 μm" at 2.699,23.155 h1 r270